# Altium PCB Main_V1.PcbDoc (part 1 of 2)
Units mil, origin at the board's own origin, x right, y up, seen from the top; angles counter-clockwise.
Board outline 5895 x 2900 mil, 4 copper layers (Top Copper, GND, PWR, Bottom Copper), stack 61.811 mil thick; 126 components, 83 nets, 421 pads, 572 vias.
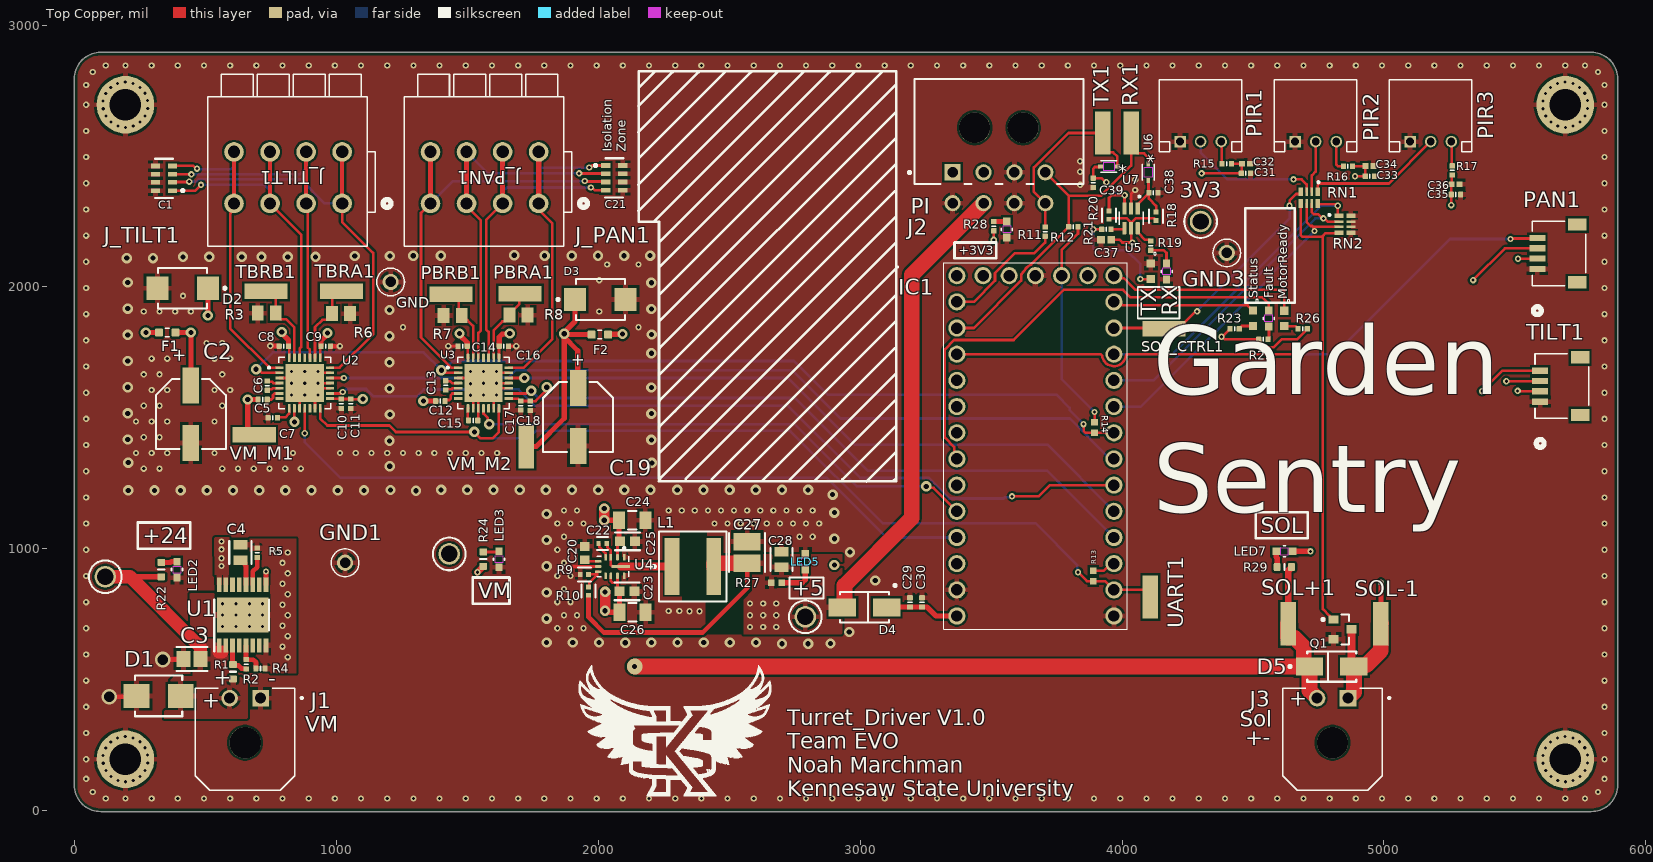
[diagram p0: Top Copper view]
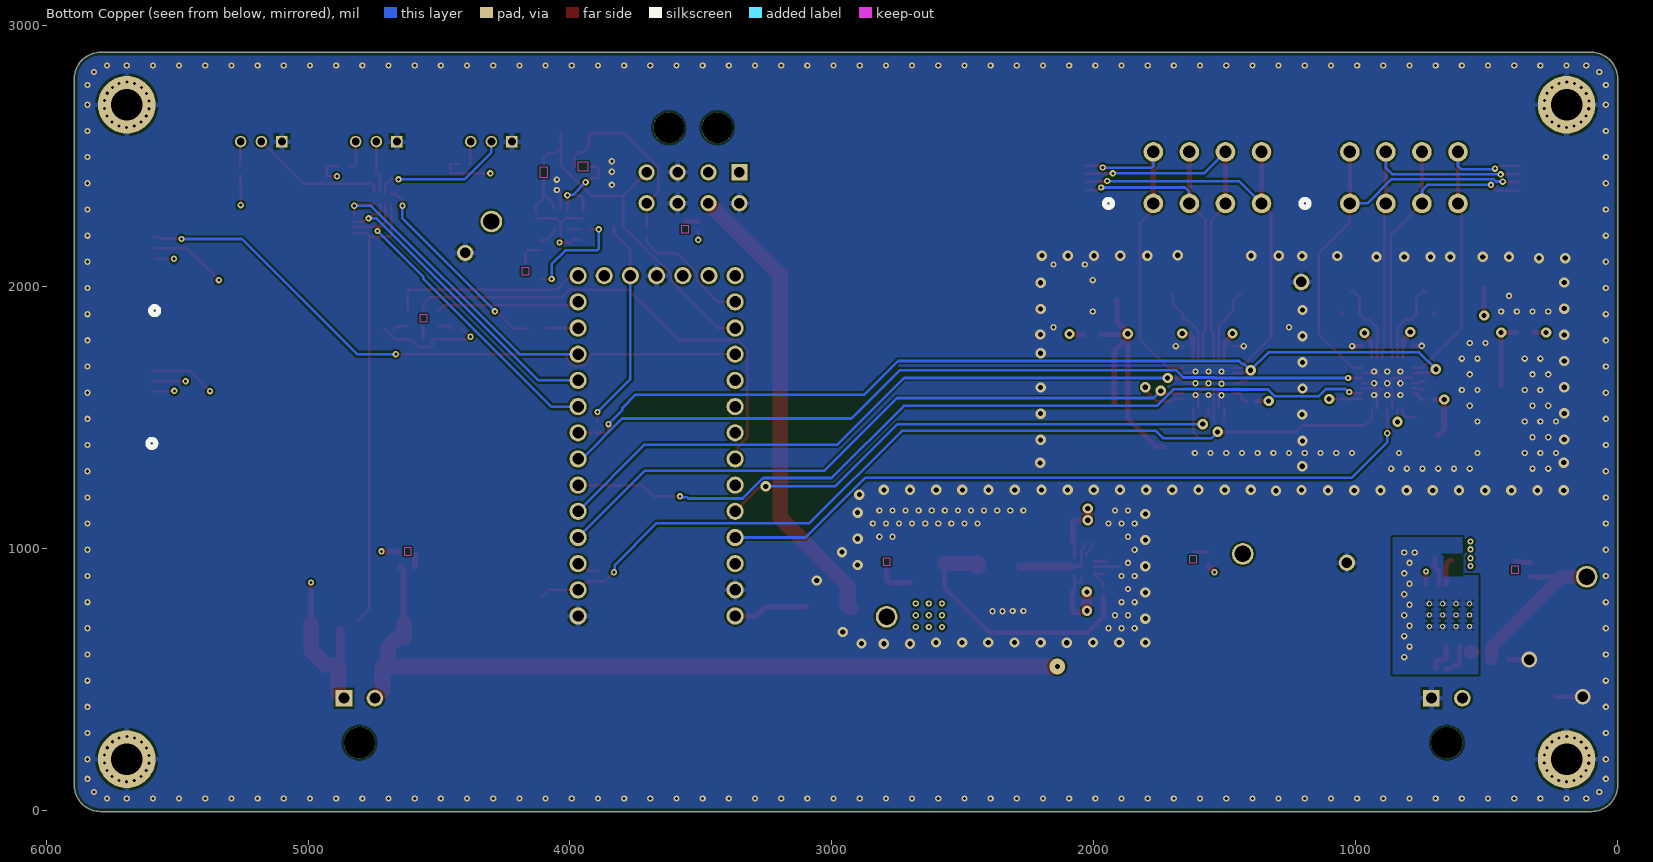
[diagram p1: Bottom Copper view, seen from below]
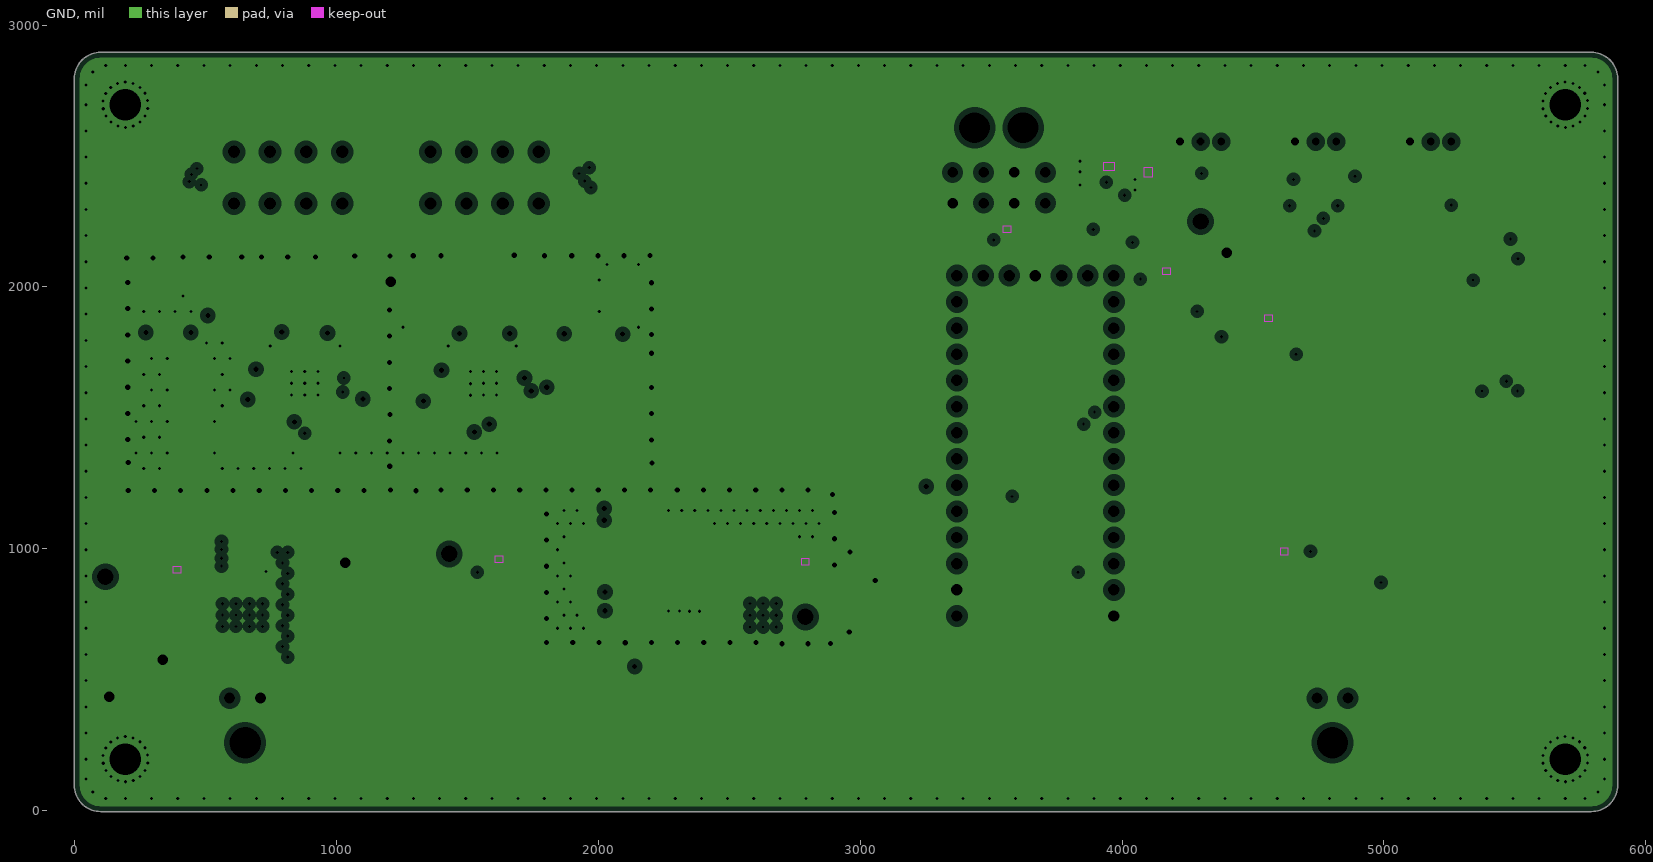
[diagram p2: GND, clearances drawn from the general rule]
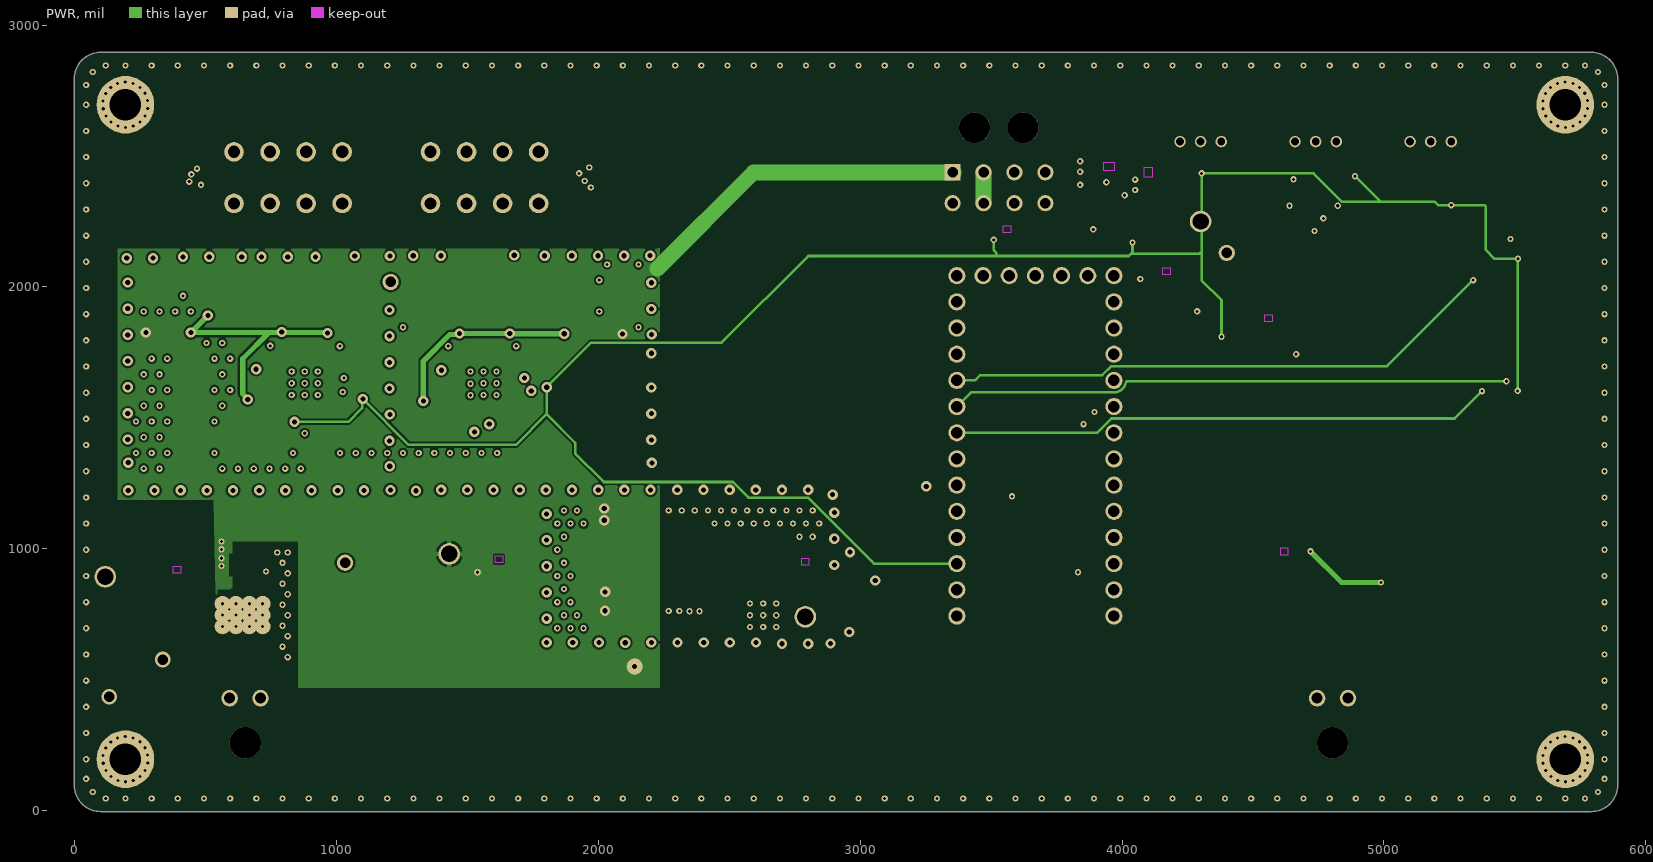
[diagram p3: PWR]
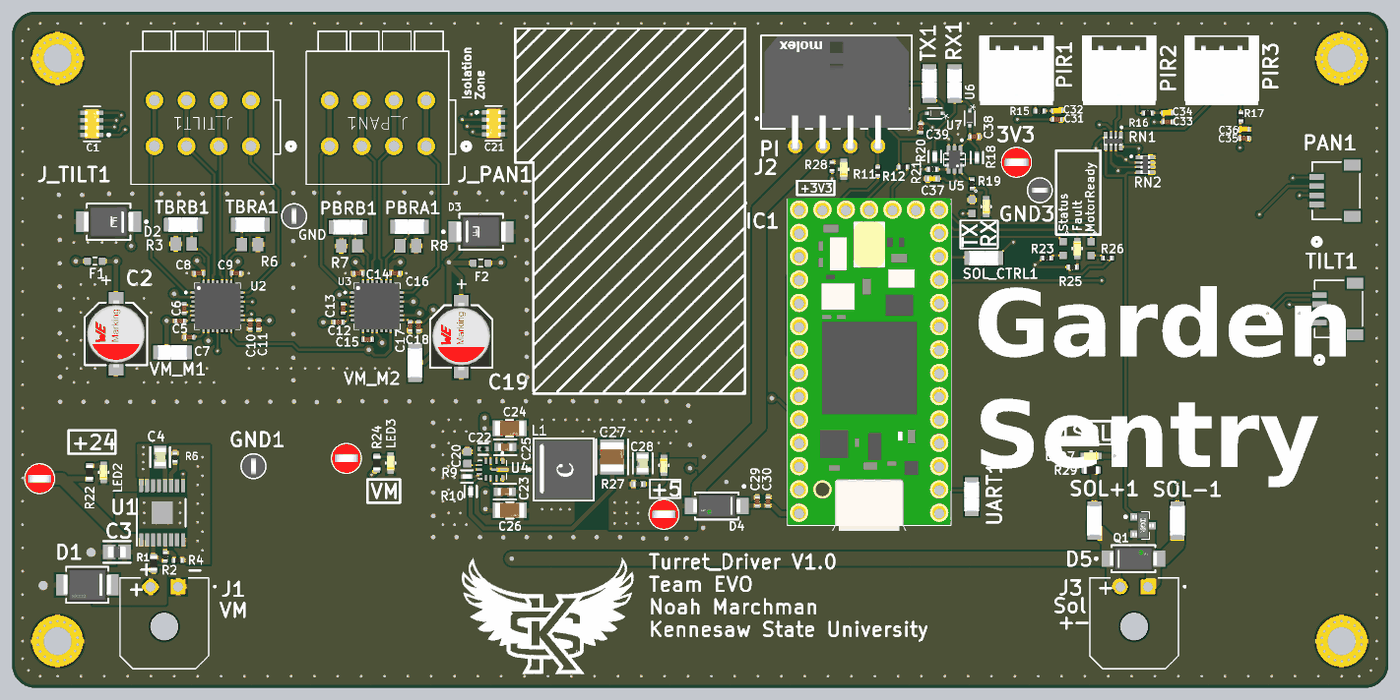
[diagram p5: 3D render of the assembled board from above, using the file's embedded part models]

## Layer stack, top to bottom
Top Mask: solder mask 0.5906, Solder Resist, Dk 3.8
Top Copper: signal copper 1.378
Dielectric 1: prepreg 7.874, 7628, Dk 4.6
GND: plane copper 0.689, net GND
Core: core 41.9291, FR-4, Dk 4.5
PWR: signal copper 0.689
Dielectric 2: prepreg 7.874, 7628, Dk 4.6
Bottom Copper: signal copper 1.378
Bottom Mask: solder mask 0.5906, Solder Resist, Dk 3.8

## Board outline
-2,96 -2,2796 cw(c98,2796) 98,2896 5793,2896 cw(c5793,2796) 5893,2796 5893,96 cw(c5793,96) 5793,-4 98,-4 cw(c98,96)

## Design rules (kind name [scope] priority, off if disabled: settings)
BoardOutlineClearance [All] p1: gap=12 ignorepadtopadclearanceinfootprint=FALSE
Clearance "Clearance Bottom Layer" [OnLayer('Bottom Layer')] p1: gap=8 ignorepadtopadclearanceinfootprint=TRUE except(10: Arc-Text Track-Text SMDPad-Text THPad-Text Via-Text Fill-Text Poly-Text Region-Text Text-Text)
Clearance "Stitching GND" [IsStitchingVia and InNet('GND') vs (IsVia and (Not IsStitchingVia)) Or IsPad] p2: gap=10 ignorepadtopadclearanceinfootprint=FALSE
Clearance "Clearance Top Layer" [OnLayer('Top Layer')] p3: gap=8 ignorepadtopadclearanceinfootprint=TRUE except(10: Arc-Text Track-Text SMDPad-Text THPad-Text Via-Text Fill-Text Poly-Text Region-Text Text-Text)
Clearance [All] p4: gap=7.87 ignorepadtopadclearanceinfootprint=FALSE except(3.5: Arc-Arc Arc-Track Arc-SMDPad Track-Track Track-SMDPad SMDPad-SMDPad; 5: Arc-Via Track-Via SMDPad-Via THPad-Via Via-Via; 10: Arc-Text Track-Text SMDPad-Text THPad-Text Via-Text Fill-Text Poly-Text Region-Text Text-Text)
HoleSize [All] p1: absolutevalues=TRUE maxlimit=248.03 minlimit=7.87 maxpercent=80.000 minpercent=20.000
MinimumAnnularRing [All] p1: minimumring=3
MinimumSolderMaskSliver [All] p1: minsoldermaskwidth=3.94
PlaneClearance [All] p1: clearance=20
PlaneConnect [All] p1: planeconnectstyle=Relief reliefexpansion=20 reliefentries=4 reliefconductorwidth=10 reliefairgap=10
PolygonConnect PolygonConnect_1 [All] p1: thpad.connectstyle=Relief thpad.reliefconductorwidth=20 thpad.reliefentries=4 thpad.polygonreliefangle="90 Angle" thpad.airgapwidth=10 smdpad.connectstyle=Relief smdpad.reliefconductorwidth=20 smdpad.reliefentries=4 smdpad.polygonreliefangle="90 Angle" smdpad.airgapwidth=10 via.connectstyle=Direct via.reliefconductorwidth=20 via.reliefentries=4 via.polygonreliefangle="90 Angle" via.airgapwidth=10
RoutingCorners [All] p1: cornerstyle=Round minsetback=100 maxsetback=100
RoutingVias [All] p1: holewidth=19.68 width=39.37 viastyle="Through Hole" minholewidth=7.87 minwidth=17.72 maxholewidth=39.37 maxwidth=78.74
SilkToSilkClearance [All] p1: silktosilkclearance=3.94
SilkToSolderMaskClearance [IsPad] p1: minsilkscreentomaskgap=3.94 clearancetoexposedcopper=TRUE
SolderMaskExpansion [All] p1: expansion=4 istentingtop=FALSE
SupplyNets "Schematic Supply Nets_8" [InNet('+3V3_R')] p1: voltage=0.000
SupplyNets "Schematic Supply Nets_7" [InNet('RTN')] p2: voltage=0.000
SupplyNets "Schematic Supply Nets_6" [InNet('+5')] p3: voltage=0.000
SupplyNets "Schematic Supply Nets_5" [InNet('GND')] p4: voltage=0.000
SupplyNets "Schematic Supply Nets_4" [InNet('VM')] p5: voltage=0.000
SupplyNets "Schematic Supply Nets_3" [InNet('+3V3')] p6: voltage=0.000
SupplyNets "Schematic Supply Nets_2" [InNet('+5OUT_Tilt')] p7: voltage=0.000
SupplyNets "Schematic Supply Nets_1" [InNet('+24')] p8: voltage=0.000
SupplyNets "Schematic Supply Nets" [InNet('+5OUT_Pan')] p9: voltage=0.000
Width [All] p1: maxlimit=100 minlimit=3.5 preferedwidth=15
23 further rules are at their usual default settings.

## Components (designator, comment, footprint, x,y, rotation, side; value= is the part's Value field where it differs from the comment)
3V3 "5010" KSTN-5010_V 4300,2250 r0 top
+3V3 "LTST-C191KRKT" LED_LTST-C191KRKT_LTO 3560,2220 r90 top (schematic designator LED6)
+5 "5010" KSTN-5010_V 2790,740 r0 top
+24 "5010" KSTN-5010_V 116,893 r0 top
C1 "470pF x 4" FP-AC0612-MFG 340,2415 r90 top value="220 pF"
C2 "100µF/50V" WCAP-ASLI_D6.3H7.7 443,1514 r90 top
C3 "1μf 100V" FP-0805-L_2_0_0_3-W_1_25-IPC_B 447,578.69 r0 top
C4 "47nF" FP-C0805C-DN-MFG 632,985.69 r90 top value="47,000 pF"
C5 "16V" CAPC0402(1005)60_L 717.28,1570 r0 top value=100nF
C6 "Capacitor 22nF +/-20% 10V 0402" CAPC0402(1005)60_L 735,1623 r270 top value=22nF/50V
C7 "10V" CAPC0402(1005)60_L 756,1500 r0 top value=2.2µF
C8 "50V" CAPC0402(1005)60_L 798,1774 r180 top value=100nF
C9 "50V" CAPC0402(1005)60_L 958,1774 r0 top value=100nF
C10 "Capacitor 10µF +/-40% 6.3V 0402" CAPC0402(1005)60_L 1018,1554 r90 top value=10µF
C11 "Capacitor 220nF +/-20% 10V 0402" CAPC0402(1005)60_L 1054,1553.72 r90 top value=220nF
C12 "16V" CAPC0402(1005)60_L 1396,1564 r0 top value=100nF
C13 "Capacitor 22nF +/-20% 10V 0402" CAPC0402(1005)60_L 1416,1624 r270 top value=22nF/50V
C14 "50V" CAPC0402(1005)60_L 1481,1774 r180 top value=100nF
C15 "10V" CAPC0402(1005)60_L 1521,1490 r180 top value=2.2µF
C16 "50V" CAPC0402(1005)60_L 1638.72,1774 r0 top value=100nF
C17 "Capacitor 220nF +/-20% 10V 0402" CAPC0402(1005)60_L 1703,1547 r90 top value=220nF
C18 "Capacitor 10µF +/-40% 6.3V 0402" CAPC0402(1005)60_L 1739,1546.28 r90 top value=10µF
C19 "100µF/50V" WCAP-ASLI_D6.3H7.7 1922,1503 r90 top
C20 "1μf 10V X7F" CAPC1608X90X35LL15T15 1948,983.41 r90 top
C21 "470pF x 4" FP-AC0612-MFG 2060.48,2416.75 r270 top value="220 pF"
C22 "100nF/16V" FP-GRM15-MFG 2016,1020 r0 top value=0.10μF
C23 "GRM188R72A104KA35D" FP-GRM188-0_1-e0_2_0_5-IPC_B 2108.61,837 r0 top
C24 "4.7uF/50V" FP-GRM31C-0_2-e0_3_0_8-IPC_C 2128.77,1109 r0 top
C25 "0.1uF/100V" FP-GRM188-0_1-e0_2_0_5-IPC_B 2110.39,1028 r0 top
C26 "GRM31CR71H475KA12L" FP-GRM31C-0_2-e0_3_0_8-IPC_C 2130,757 r0 top
C27 "47μF/16V" FP-GRM32E-0_3-0_2-IPC_C 2568,986 r90 top
C28 "0.10 μF" FP-C0805C-DN-MFG 2699,959 r90 top
C29 "Capacitor 10µF +/-40% 6.3V 0402" CAPC0402(1005)60_L 3190,795 r90 top value=10µF
C30 "Capacitor 100nF +/-20% 50V 0402" CAPC0402(1005)60_L 3236,795.28 r90 top value=100nF
C31 "Capacitor 10µF +/-40% 6.3V 0402" CAPC0402(1005)60_L 4473.28,2434 r0 top value=10µF
C32 "Capacitor 0.1 uF +/- 5% 16 V 0402" CAPC1005X56X25LL10T15 4473.65,2471 r0 top value=100nF
C33 "Capacitor 10µF +/-40% 6.3V 0402" CAPC0402(1005)60_L 4946.72,2423 r0 top value=10µF
C34 "Capacitor 0.1 uF +/- 5% 16 V 0402" CAPC1005X56X25LL10T15 4945,2462 r0 top value=100nF
C35 "Capacitor 10µF +/-40% 6.3V 0402" CAPC0402(1005)60_L 5275.28,2353 r0 top value=10µF
C36 "Capacitor 0.1 uF +/- 5% 16 V 0402" CAPC1005X56X25LL10T15 5273.65,2392 r0 top value=100nF
C37 "Capacitor 1 uF +/- 10% 6.3 V 1005" CAPC1005X55X25ML5T10 3939.29,2180 r180 top value=1µF
C38 "Capacitor 220nF +/-20% 10V 0402" CAPC0402(1005)60_L 4120,2360 r180 top value=470nF
C39 "Capacitor 220nF +/-20% 10V 0402" CAPC0402(1005)60_L 3890,2397.72 r90 top value=470nF
D1 "SMBJ33CA-13-F" FP-SMB-CA-MFG 320,437.69 r180 top
D2 "SMBJ26A" FP-SMBJ-MFG 411.54,1995 r180 top
D3 "SMBJ26A" FP-SMBJ-MFG 2007,1952 r0 top
D4 "SS14" FP-403AE-MFG 3016.35,776 r0 top
D5 "SS14" FP-403AE-MFG 4801,550 r180 top
F1 "FUSE-1A/32V-3" LFUS-467_V 352.5,1826 r180 top
F2 "FUSE-1A/32V-3" LFUS-467_V 2004.99,1818 r0 top
Fault "LTST-C191KRKT" LED_LTST-C191KRKT_LTO 4560,1880 r270 top (schematic designator LED4)
GND "5001" FP-5001-MFG 1206,2019 r90 top
GND1 "5001" FP-5001-MFG 1032,946.5 r90 top
GND3 "5001" FP-5001-MFG 4400,2130 r0 top
IC1 "TEENSY_4.0" TEENSY40 3969,743 r90 top
J1 "436500200" MOLEX_436500200 650,272.69 r0 top
J2 "43045-0802" FP-43045-0802-MFG 3529.48,2594.02 r180 top
J3 "436500200" MOLEX_436500200 4804,272.69 r0 top
J_PAN1 "2601-1104" CONN4_2601-1104_WAG 1771.59,2319 r180 top
J_TILT1 "2601-1104" CONN4_2601-1104_WAG 1021,2319 r180 top
L1 "10uH" FP-XAL6060-MFG 2360.53,932 r0 top
LED2 "LTST-C191KRKT" LED_LTST-C191KRKT_LTO 390,920 r90 top
LED3 "LTST-C191KRKT" LED_LTST-C191KRKT_LTO 1620,960 r90 top
LED5 "LTST-C191KRKT" LED_LTST-C191KRKT_LTO 2790,950 r270 top
LED7 "LTST-C191KRKT" LED_LTST-C191KRKT_LTO 4620,990 r180 top
MotorReady "LTST-C190GKT" LEDM1608X80 4620,1880 r270 top (schematic designator D8)
PAN1 "PRT-14417" CONN_PRT-14417_SPK 5669,2128 r90 top
PBRA1 "RCWCTE" TP420X150 1700,1974 r180 top
PBRB1 "RCWCTE" TP420X150 1437,1972 r0 top
PIR1 "S3B-PH-K-S" S3B-PH-K-S 4300.26,2555 r0 top
PIR2 "S3B-PH-K-S" S3B-PH-K-S 4739.63,2555 r0 top
PIR3 "S3B-PH-K-S" S3B-PH-K-S 5179,2555 r0 top
Q1 "IRLML6344" SOT95P237X112-3N-2-V 4842.16,692 r0 top
R1 "120R3J" RESC0603(1608)_L 604,530.13 r270 top value=931K
R2 "13K" RESC0402(1005)_L 654,558.69 r90 top
R3 "0.62 Ohm" RESC2013X50X40NL20T20 733,1900 r180 top
R4 "44.2K" RESC0402(1005)_L 709,542.69 r180 top
R5 "6.04K" RESC0402(1005)_L 696,984.69 r270 top
R6 "RL1220S-R82-F" RESC2013X50X40NL20T20 1017,1898 r0 top
R7 "RL1220S-R82-F" RESC2013X50X40NL20T20 1443,1891 r0 top
R8 "0.62ohm" RESC2013X50X40NL20T20 1695,1892 r0 top
R9 "24.9K Ohm" FP-CRCW0402-e3-IPC_C 1946.17,902 r0 top
R10 "100K Ohm" FP-CRCW0402-e3-IPC_C 1962,838.17 r270 top
R11 "100R2F" RESC0402(1005)_L 3706,2211.28 r90 top value=100
R12 "10KR2F" RESC0402(1005)_L 3814,2230 r0 top value=10k
R13 "Resistor 1k +/-1% 0402 100 mW" RESC1005X40X25ML05T05 3890,896 r90 top value=1k
R14 "Resistor 10k +/-1% 0402 100 mW" RESC1005X40X25ML05T05 3895,1463 r90 top value=10k
R15 "33R2J" RESC0402(1005)_L 4400,2470 r0 top value=33
R16 "33R2J" RESC0402(1005)_L 4863,2461 r0 top value=33
R17 "33R2J" RESC0402(1005)_L 5261,2445 r270 top value=33
R18 "100K Ohm" FP-CRCW0402-e3-IPC_C 4130,2270 r270 top
R19 "240R2J" RESC0402(1005)_L 4110,2157.72 r270 top value=433
R20 "100K Ohm" FP-CRCW0402-e3-IPC_C 3950,2274.17 r270 top
R21 "240R2J" RESC0402(1005)_L 3940,2220 r180 top value=240
R22 "120R3J" RESC0603(1608)_L 330,920 r90 top value=ERJ-3EKF7321V
R23 "240R2J" RESC0402(1005)_L 4430,1840 r0 top value=300
R24 "120R3J" RESC0603(1608)_L 1560,960 r90 top value=ERJ-3EKF7321V
R25 "240R2J" RESC0402(1005)_L 4540,1800 r0 top value=433
R26 "240R2J" RESC0402(1005)_L 4690,1840 r180 top value=300
R27 "Resistor 1k +/-1% 0402 100 mW" RESC1005X40X25ML05T05 2680,870 r0 top value=1k
R28 "240R2J" RESC0402(1005)_L 3510,2232.28 r90 top value=433
R29 "120R3J" RESC0603(1608)_L 4620,930 r180 top value=ERJ-3EKF7321V
RN1 "YC124-JR-07100RL" RESCAXS50P200X100X55-8N 4714.84,2340.83 r270 top
RN2 "YC124-JR-07100KL" RESCAXS50P200X100X55-8N 4851.17,2239.52 r0 top
RX "LTST-C191KRKT" LED_LTST-C191KRKT_LTO 4170,2059.5 r90 top (schematic designator LED1)
RX1 "RCWCTE" TP420X150 4035,2588 r90 top
SOL+1 "RCWCTE" TP420X150 4634,713 r90 top
SOL-1 "RCWCTE" TP420X150 4989,713 r90 top
SOL_CTRL1 "RCWCTE" TP420X150 4160,1840 r0 top
Status "LTST-C190GKT" LEDM1608X80 4500,1880.47 r270 top (schematic designator D7)
TBRA1 "RCWCTE" TP420X150 1018,1983 r180 top
TBRB1 "RCWCTE" TP420X150 730,1983 r180 top
TILT1 "PRT-14417" CONN_PRT-14417_SPK 5680,1621 r90 top
TX "LTST-C190GKT" LEDM1608X80 4110,2060 r270 top (schematic designator D6)
TX1 "RCWCTE" TP420X150 3927,2588 r90 top
U1 "TPS26600PWPR" PWP0016H_N 640.57,746.55 r90 top
U2 "TMC2209-LA" QFN50P500X500X90-29N 877.94,1632.54 r0 top
U3 "TMC2209-LA" QFN50P500X500X90-29N 1560.68,1632.54 r0 top
U4 "LMR33630ARNXR" CONV_LMR33630ARNXR 2054,932 r270 top
U5 "SN74LVC2G14IDCKRQ1" SOT65P210X110-6N 4034.41,2262.2 r270 top
U6 "RB520S30T5G" SOD-523_0P9X1P3_ONS 4100,2438.5 r270 top
U7 "RB520S30T5G" SOD-523_0P9X1P3_ONS 3950,2460 r180 top
UART1 "RCWCTE" TP420X150 4108,816 r270 top
VM "5010" KSTN-5010_V 1430,980 r0 top (schematic designator VM1)
VM_M1 "RCWCTE" TP420X150 685,1435 r180 top
VM_M2 "RCWCTE" TP420X150 1724,1390 r90 top

## Footprints (in the part's own frame and the unit in brackets; to place one, negate y for a bottom-side part, rotate by r counter-clockwise, add the part's x,y. Pads: shape width x height; smd on the part's side, far side on the other; paste and mask are expansions set on the pad)
CAPC0402(1005)60_L [mm] "Chip Capacitor, Body 1.0x0.5mm, Height 0.6mm, IPC High Density"
  rrect25% 0.5x0.55 smd: 1(-0.45,0) 2(0.45,0)
  silkscreen extent 0,-0.2 0,0.2, body extent -0.5,-0.25 0.5,0.25, height 0.6
CAPC1005X55X25ML5T10 [mm] "Chip Capacitor, 2-Leads, Body 1.05x0.55mm, IPC Low Density"
  rect 0.76x0.72 smd: 1(-0.49,0) 2(0.49,0)
  body extent -0.53,-0.28 0.53,0.28, height 0.55
CAPC1005X56X25LL10T15 [mm] "Chip Capacitor, 2-Leads, Body 1.10x0.60mm, IPC High Density"
  rect 0.58x0.54 smd: 1(-0.39,0) 2(0.39,0)
  body extent -0.55,-0.3 0.55,0.3, height 0.56
CAPC1608X90X35LL15T15 [mm] "Chip Capacitor, 2-Leads, Body 1.60x0.81mm, IPC High Density"
  rect 0.85x0.9 smd: 1(-0.65,0) 2(0.65,0)
  body extent -0.88,-0.48 0.87,0.48, height 0.9
CONN4_2601-1104_WAG [mm]
  round 1.9 hole 1.2 paste-2539.97 mask+0: 1(0,0) 2(0,-5) 3(3.5,0) 4(3.5,-5) 5(7,0) 6(7,-5) 7(10.5,0) 8(10.5,-5)
  silkscreen extent -4.74,-12.52 13.05,4.15
CONN_PRT-14417_SPK [mil]
  rect 24x61 smd paste+0 mask+0: 1(-59.06,82.74) 2(-19.69,82.74) 3(19.69,82.74) 4(59.06,82.74)
  rect 47x71 smd paste+0 mask+0: 5(-110.24,-69.82) 6(110.24,-69.82)
  silkscreen extent -234,-102 123,103
CONV_LMR33630ARNXR [mm]
  rrect40% 0.6x0.25 smd paste+0 mask+0.102: 1(-0.9,1.125) 2(-0.9,0.475) 3(-0.9,-0.175) 4(-0.9,-0.675) 8(0.9,-0.675) 9(0.9,-0.175) 10(0.9,0.475) 11(0.9,1.125)
  rrect40% 0.25x0.6 smd paste+0 mask+0.102: 5(-0.5,-1.4) 6(0,-1.4) 7(0.5,-1.4)
  rrect40% 0.25x1.825 smd paste-2 mask+0.102: 12(0,0.788)
  silkscreen extent -1.9,-1.5 1,1.57
FP-403AE-MFG [mm]
  rect 2.65x1.75 smd paste+0 mask+0: 1(-2.15,0) 2(2.15,0)
  silkscreen extent -2.37,-1.48 3.09,2.26, body extent -3.57,-1.58 3.57,1.58, height 0.25
FP-0805-L_2_0_0_3-W_1_25-IPC_B [mil]
  rect 53.4x61.35 smd paste+0 mask+0: 1(-32.52,0) 2(32.52,0)
  silkscreen extent -59,-46 59,46, body extent -69,-41 69,41, height 10
FP-5001-MFG [mm]
  round 1.57 hole 1.016 paste-2539.97 mask+0: 1(0,0)
  silkscreen extent -1.34,-1.35 1.34,1.35, body extent -1.45,-1.45 1.45,1.45, height 0.25
FP-43045-0802-MFG [mm]
  rect 1.57x1.57 hole 1.02 paste-2539.97 mask+0: 1(4.49,3.965)
  round 1.57 hole 1.02 paste-2539.97 mask+0: 2(1.49,3.965) 3(-1.51,3.965) 4(-4.51,3.965) 5(4.49,6.965) 6(1.49,6.965) 7(-1.51,6.965) 8(-4.51,6.965)
  round 3 hole 3 unplated paste-2539.97 mask+0: ""(-2.35,-0.355) ""(2.35,-0.355)
  silkscreen extent -8.2,-5.08 8.79,5.08, body extent -8.3,-5.18 8.3,7.85, height 0.25
FP-AC0612-MFG [mm]
  rect 0.45x0.89 smd paste+0 mask+0: 1(-1.2,-0.825) 2(-0.4,-0.825) 3(0.4,-0.825) 4(1.2,-0.825) 5(1.2,0.825) 6(0.4,0.825) 7(-0.4,0.825) 8(-1.2,0.825)
  silkscreen extent -1.9,-1.95 1.9,0.87, body extent -1.78,-1.37 1.78,1.37, height 0.25
FP-C0805C-DN-MFG [mm]
  rect 0.95x1.35 smd paste+0 mask+0: 1(-0.75,0) 2(0.75,0)
  silkscreen extent -1.1,-1.07 1.1,1.07, body extent -1.4,-0.85 1.4,0.85, height 0.25
FP-CRCW0402-e3-IPC_C [mil]
  rect 18.43x18.6 smd paste+0 mask+0: 1(-15.83,0) 2(15.83,0)
  silkscreen extent -25,-27 25,27, body extent -29,-15 29,15, height 10
FP-GRM15-MFG [mm]
  rect 0.4x0.5 smd paste+0 mask+0: 1(-0.4,0) 2(0.4,0)
  silkscreen extent -0.53,-0.63 0.53,0.63, body extent -0.7,-0.38 0.7,0.38, height 0.25
FP-GRM31C-0_2-e0_3_0_8-IPC_C [mil]
  rect 45.46x67.17 smd paste+0 mask+0: 1(-50.23,0) 2(50.23,0)
  silkscreen extent -16,-35 16,35, body extent -77,-39 77,39, height 10
FP-GRM32E-0_3-0_2-IPC_C [mil]
  rect 67.04x102.61 smd paste+0 mask+0: 1(-41.36,0) 2(41.36,0)
  silkscreen extent -75,-69 75,69, body extent -79,-57 79,57, height 10
FP-GRM188-0_1-e0_2_0_5-IPC_B [mil]
  rect 37.74x35.91 smd paste+0 mask+0: 1(-28.61,0) 2(28.61,0)
  silkscreen extent -47,-34 47,34, body extent -57,-28 57,28, height 10
FP-SMB-CA-MFG [mm]
  rect 2.5x2.3 smd paste+0 mask+0: 1(-2.15,0) 2(2.15,0)
  silkscreen extent -2.28,-1.97 2.28,1.97, body extent -3.5,-2.07 3.5,2.07, height 0.25
FP-SMBJ-MFG [mm]
  rect 2.16x2.26 smd paste+0 mask+0: 1(-2.45,0) 2(2.45,0)
  silkscreen extent -4.23,-1.97 2.37,1.97, body extent -3.63,-2.07 3.63,2.07, height 0.25
FP-XAL6060-MFG [mm]
  rect 1.43x5.5 smd paste+0 mask+0: 1(-2.02,0) 2(2.02,0)
  silkscreen extent -3.87,-3.38 3.28,3.38, body extent -3.38,-3.48 3.38,3.48, height 0.25
KSTN-5010_V [mm] "Test Point, Dia 3.17mm"
  round 2.1 hole 1.6: 1(0,0)
  silkscreen extent -1.59,-1.58 1.59,1.58, body extent -1.59,-1.59 1.59,1.59, height 8.13
LED_LTST-C191KRKT_LTO [mil]
  rect 30x28 smd paste+0 mask+0: 1(-30.5,0) 2(30.5,0)
  Top Copper keep-out region: -13.5,-14 -13.5,14 13.5,14 13.5,-14
  Keep-Out Layer region: -13.5,-14 -13.5,14 13.5,14 13.5,-14
  silkscreen extent -4,-21 4,21, body extent 0,0 0,0
LEDM1608X80 [mm]
  rect 0.8x0.8 smd: A(0.75,0) C(-0.75,0)
  silkscreen extent -1.83,0.27 -1.57,0.53
LFUS-467_V [mm] "SMD, 2-Leads, Body 1.6x0.813mm"
  rrect25% 0.75x0.8 smd: 1(-0.8,0) 2(0.8,0)
  silkscreen extent -0.2,-0.4 0.2,0.4, body extent -0.8,-0.41 0.8,0.41, height 0.43
MOLEX_436500200 [mm]
  rect 1.605x1.605 / inner round 1.605 / far side rect 1.605x1.605 hole 1.07: 1(1.5,3.97)
  round 1.605 hole 1.07: 2(-1.5,3.97)
  round 3.05 hole 3.05 unplated: ""(0,-0.35)
  silkscreen extent -4.82,-4.95 5.6,4.95
PWP0016H_N [mm]
  rect 1.4x0.45 smd paste+0 mask+0.051: 1(-2.95,2.275) 2(-2.95,1.625) 3(-2.95,0.975) 4(-2.95,0.325) 5(-2.95,-0.325) 6(-2.95,-0.975) 7(-2.95,-1.625) 8(-2.95,-2.275) 9(2.95,-2.275) 10(2.95,-1.625) 11(2.95,-0.975) 12(2.95,-0.325) 13(2.95,0.325) 14(2.95,0.975) 15(2.95,1.625) 16(2.95,2.275)
  rect 3.4x5 smd paste-2.487 mask-2.489: 17(0,0)
  round 0.5 / inner round 1.524 / far side round 0.5 hole 0.3 paste-2539.97 mask-0.241: V(-1.1,1.95) V(-1.1,-1.95) V(0,1.95) V(0,0.65) V(0,-0.65) V(0,-1.95) V(1.1,1.95) V(1.1,-1.95)
  round 0.5 / inner round 1.524 / far side round 0.5 hole 0.3 paste-2539.97 mask-0.152: V(-1.1,-0.65) V(-1.1,0.65) V(1.1,-0.65) V(1.1,0.65)
  silkscreen extent -3.55,-2.55 1.5,2.75
QFN50P500X500X90-29N [mm]
  rrect25% 0.81x0.27 smd: 1(-2.45,1.5) 2(-2.45,1) 3(-2.45,0.5) 4(-2.45,0) 5(-2.45,-0.5) 6(-2.45,-1) 7(-2.45,-1.5) 15(2.45,-1.5) 16(2.45,-1) 17(2.45,-0.5) 18(2.45,0) 19(2.45,0.5) 20(2.45,1) 21(2.45,1.5)
  rrect25% 0.27x0.81 smd: 8(-1.5,-2.45) 9(-1,-2.45) 10(-0.5,-2.45) 11(0,-2.45) 12(0.5,-2.45) 13(1,-2.45) 14(1.5,-2.45) 22(1.5,2.45) 23(1,2.45) 24(0.5,2.45) 25(0,2.45) 26(-0.5,2.45) 27(-1,2.45) 28(-1.5,2.45)
  rect 3.7x3.7 smd paste-0.68: 29(0,0)
  silkscreen extent -3.56,-2.5 2.5,2.5, body extent -2.5,-2.5 2.5,2.5, height 0.9
RESC0402(1005)_L [mm] "Chip Resistor, Body 1.0x0.5mm, IPC High Density"
  rrect25% 0.5x0.55 smd: 1(-0.45,0) 2(0.45,0)
  silkscreen extent 0,-0.2 0,0.2, body extent -0.5,-0.25 0.5,0.25, height 0.3
RESC0603(1608)_L [mm] "Chip Resistor, Body 1.6x0.8mm, IPC High Density"
  rrect25% 0.66x0.76 smd: 1(-0.7,0) 2(0.7,0)
  silkscreen extent 0,-0.3 0,0.3, body extent -0.8,-0.4 0.8,0.4, height 0.45
RESC1005X40X25ML05T05 [mm] "Chip Resistor, 2-Leads, Body 1.05x0.55mm, IPC Low Density"
  rect 0.65x0.65 smd: 1(-0.5,0) 2(0.5,0)
  body extent -0.53,-0.28 0.53,0.28, height 0.4
RESC2013X50X40NL20T20 [mm] "Chip Resistor, 2-Leads, Body 2.00x1.25mm, IPC Medium Density"
  rect 1.15x1.45 smd: 1(-0.875,0) 2(0.875,0)
  body extent -1.1,-0.72 1.1,0.72, height 0.5
RESCAXS50P200X100X55-8N [mm]
  rect 0.87x0.41 smd: 1(-0.58,0.825) 4(-0.58,-0.825) 5(0.58,-0.825) 8(0.58,0.825)
  rect 0.87x0.26 smd: 2(-0.58,0.25) 3(-0.58,-0.25) 6(0.58,-0.25) 7(0.58,0.25)
  silkscreen extent -1.6,0.8 -1.4,1, body extent -0.5,-1 0.5,1, height 0.55
S3B-PH-K-S [mil]
  rect 43.62x43.62 / inner round 43.62 / far side rect 43.62x43.62 hole 30 mask+4.02: 1(-78.74,0)
  round 43.62 hole 30 mask+4.02: 2(0,0) 3(78.74,0)
  silkscreen extent -157,-39 157,236, body extent -156,-60 156,239, height 189
SOD-523_0P9X1P3_ONS [mil]
  rect 20x14 smd paste+0 mask+0: 1(-31.5,0) 2(31.5,0)
  Top Copper keep-out region: -19.5,-15.5 -19.5,15.5 19.5,15.5 19.5,-15.5
  Keep-Out Layer region: -19.5,-15.5 -19.5,15.5 19.5,15.5 19.5,-15.5
  silkscreen extent -31,-23 31,23, body extent -34,-17 34,17, height 18
SOT65P210X110-6N [mm]
  rrect25% 1.19x0.4 smd paste+0 mask+0.102: 1(-0.96,0.65) 2(-0.96,0) 3(-0.96,-0.65) 4(0.96,-0.65) 5(0.96,0) 6(0.96,0.65)
  silkscreen extent -2.2,-1.17 0.63,1.17, body extent -1.05,-1 1.05,1, height 1.1
SOT95P237X112-3N-2-V [mm] "SOT,0.95mm pitch;3 pin,1.30mm W X 2.92mm L X 1.12mm H body"
  rect 0.972x0.802 smd paste+0 mask+0: 1(-0.885,0.95) 2(-0.885,-0.95) 3(0.885,0)
  silkscreen extent -2.02,-1.46 0.65,1.46, body extent -1.2,-1.46 1.2,1.46, height 1.12
TEENSY40 [mm]
  round 1.665 hole 1.11: 1(0,0) 2(2.54,0) 3(5.08,0) 4(7.62,0) 5(10.16,0) 6(12.7,0) 7(15.24,0) 8(17.78,0) 9(20.32,0) 10(22.86,0) 11(25.4,0) 12(27.94,0) 13(30.48,0) 14(33.02,0) 15(33.02,2.54) 16(33.02,5.08) 17(33.02,7.62) 18(33.02,10.16) 19(33.02,12.7) 20(33.02,15.24) 21(30.48,15.24) 22(27.94,15.24) 23(25.4,15.24) 24(22.86,15.24) 25(20.32,15.24) 26(17.78,15.24) 27(15.24,15.24) 28(12.7,15.24) 29(10.16,15.24) 30(7.62,15.24) 31(5.08,15.24) 32(2.54,15.24) 33(0,15.24)
  silkscreen extent -1.27,-1.27 34.29,16.51, body extent -1.87,-1.27 34.39,16.51, height 4.55
TP420X150 [mm]
  rect 4.2x1.5 smd: 1(0,0)
  body extent -1.6,-0.8 1.6,0.8, height 2.01
WCAP-ASLI_D6.3H7.7 [mm] "Aluminium Electrolytic V-Chip SMT Capacitors, 6.3x7.7mm"
  rect 3.5x1.6 smd: 1(2.8,0) 2(-2.8,0)
  silkscreen extent -3.4,-3.4 3.4,3.4, body extent -3.65,-3.3 3.65,3.3, height 7.7

## Part data
3V3 +5 +24 VM: library part CMP-1672-00002-4, "Test Point, Red, Through Hole, RoHS, Bulk", Colour=Red, Manufacturer=Keystone, Package Quantity=100, ComponentLink1Description="Manufacturer URL", ComponentLink1URL=http://www.keyelco.com/, ComponentLink2Description=Datasheet, ComponentLink2URL=http://www.keyelco.com/product-pdf.cfm?p=1319, Contact Material=Bronze, Contact Plating=Silver, DatasheetVersion="Rev. F, 12/2013", Height="8.12 mm", Mount="Through Hole", Mounting Technology="Through Hole", PackageDescription="1-Pin Through Hole Device, Dia 3.17 mm", PackageReference=5010, Packaging=Bulk, Pins=1, REACH SVHC="No SVHC", RoHSCompliant=true
+3V3 Fault LED2 LED3 LED5 LED7 RX: "Description", Manufacturer_Name=LITE-ON, Copyright="Copyright (C) 2025 Ultra Librarian. All rights reserved.", Manufacturer_Part_Number=LTST-C191KRKT
C1: library part CMP-03425-000006-1, "AC0612 220 pF NP0 5.00% 50 V", Capacitance="220 pF", Manufacturer=Yageo, Manufacturer Part Number=AC0612JRNPO9BN221, Package=AC0612, Temperature="-55°C to +125°C", Temperature Characteristic=NP0, Temperature Coefficient=30ppm/°C, Temperature Range High=+125°C, Temperature Range Low=-55°C, Tolerance=0.05, Voltage Rating="50 V", Automotive=Yes, Automotive Grade="Grade 1", Category=Cap, ComponentLink2Description=Datasheet, ComponentLink2URL=http://www.yageo.com/documents/recent/UPY-AC_NP0X7R_16V-to-630V_12.pdf, Device Class L1="Passive Components", Device Class L2=Capacitors, Device Class L3="Capacitor Arrays", Footprint Url=http://www.yageo.com/exep/pages/download/literatures/UPY-C_GEN_24.pdf, Height=0.9mm, Lead Free=Yes, Material=Ceramic, Octopart=https://octopart.com/ac0612jrnpo9bn221-yageo-75656623, RoHS=TRUE
C2 C19: library part CMP-03913-54202496-2, "Cap Aluminum Lytic 100uF 35V 20% (6.3 X 7.7mm) SMD 300mA 2000h 105C T/R", Capacitance=100µF, Case/Package=Radial, ESR (Equivalent Series Resistance)=321.392mΩ, Insulation Resistance=1MΩ, Leakage Current=35µA, Max Operating Temperature=105°C, Min Operating Temperature=-55°C, Ripple Current=300mA, Tolerance=20%, Voltage Rating=35V, Diameter=6.3mm, Dissipation Factor=14%, Height=7.7mm, Impedance=380mΩ, Length=7.7mm, Life (Hours)=2000hours, Packaging="Cut Tape", REACH SVHC=Unknown, Ripple Current (AC)=300mA, RoHS=Compliant, Voltage Rating (DC)=35V, Width=6.6mm
C3: library part CMP-14477-003884-2, "None"
C4: library part CMP-03020-021891-1, "C0805 47,000 pF U2J 30ppm/°C 1.00% 50 V", Capacitance="47,000 pF", Manufacturer=KEMET, Manufacturer Part Number=C0805C473F5JACAUTO, Package=C0805C-DN, Temperature="-55°C to +125°C", Temperature Characteristic=U2J, Temperature Coefficient=30ppm/°C, Temperature Range High=+125°C, Temperature Range Low=-55°C, Tolerance=0.01, Voltage Rating="50 V", Automotive=No, Category=Cap, ComponentLink2Description=Datasheet, ComponentLink2URL=https://content.kemet.com/datasheets/KEM_C1003_C0G_SMD.pdf, Device Class L1="Passive Components", Device Class L2=Capacitors, Device Class L3="Ceramic Capacitors", Height=0.88mm, Ipc Land Pattern Name=CAPC200125X78, Lead Free=Yes, Material=Ceramic, Octopart=https://octopart.com/c0805c473f5jacauto-kemet-84731962, RoHS=TRUE
C5 C12 C30: library part CMP-001-00067-3, "Chip Capacitor, 100nF +/-20%, 50V, 0402, Thickness 0.6 mm", Case/Package=0402, Max Operating Temperature=85°C, Min Operating Temperature=-55°C, Tolerance=10%, Voltage Rating=50V, Mounting Technology=SMT, Pins=2
C6 C13: library part CMP-001-00062-3, "Chip Capacitor, 22nF +/-20%, 10V, 0402, Thickness 0.6 mm", Case/Package=0402, Max Operating Temperature=85°C, Min Operating Temperature=-55°C, Tolerance=10%, Voltage Rating=10V, Mounting Technology=SMT, Pins=2
C7 C15: library part CMP-001-00056-4, "Chip Capacitor, 2,2µF +/-20%, 10V, 0402, Thickness 0.6 mm", Case/Package=0402, Max Operating Temperature=85°C, Min Operating Temperature=-55°C, Tolerance=10%, Mounting Technology=SMT, Pins=2, Voltage Rating=10V
C8 C9 C14 C16: library part CMP-001-00067-3, "Chip Capacitor, 100nF +/-20%, 50V, 0402, Thickness 0.6 mm", Case/Package=0402, Max Operating Temperature=85°C, Min Operating Temperature=-55°C, Tolerance=10%, Mounting Technology=SMT, Pins=2, Voltage Rating=50V
C10 C18 C29 C31 C33 C35: library part CMP-001-00074-3, "Chip Capacitor, 10µF +/-40%, 6.3V, 0402, Thickness 0.6 mm", Case/Package=0402, Max Operating Temperature=85°C, Min Operating Temperature=-55°C, Tolerance=10%, Voltage Rating=6.3V, Mounting Technology=SMT, Pins=2
C11 C17: library part CMP-001-00057-3, "Chip Capacitor, 220nF +/-20%, 10V, 0402, Thickness 0.6 mm", Case/Package=0402, Max Operating Temperature=85°C, Min Operating Temperature=-55°C, Tolerance=10%, Voltage Rating=10V, Mounting Technology=SMT, Pins=2
C20: library part CMP-2006-04500-1, Manufacturer="AVX Interconnect / Elco", Part Number=0603YC105MAT2A
C21: library part CMP-03425-000006-1, Capacitance="220 pF", Manufacturer=Yageo, Manufacturer Part Number=AC0612JRNPO9BN221, Package=AC0612, Temperature="-55°C to +125°C", Temperature Characteristic=NP0, Temperature Coefficient=30ppm/°C, Temperature Range High=+125°C, Temperature Range Low=-55°C, Tolerance=0.05, Voltage Rating="50 V", Automotive=Yes, Automotive Grade="Grade 1", Category=Cap, ComponentLink2Description=Datasheet, ComponentLink2URL=http://www.yageo.com/documents/recent/UPY-AC_NP0X7R_16V-to-630V_12.pdf, Device Class L1="Passive Components", Device Class L2=Capacitors, Device Class L3="Capacitor Arrays", Footprint Url=http://www.yageo.com/exep/pages/download/literatures/UPY-C_GEN_24.pdf, Height=0.9mm, Lead Free=Yes, Material=Ceramic, Octopart=https://octopart.com/ac0612jrnpo9bn221-yageo-75656623, RoHS=TRUE
C22: library part CMP-2100-03641-2, "CAP CER 0.1UF 16V X7R 0402", Capacitance=0.10μF, Manufacturer=Murata, Manufacturer Part Number=GRM155R71C104KA88D, Package=GRM15, Temperature="-55°C to +125°C", Temperature Characteristic=X7R, Temperature Range High=+125°C, Temperature Range Low=-55°C, Tolerance=10%, Voltage Rating=16Vdc, Category=Cap, ComponentLink2Description=Datasheet, ComponentLink2URL=https://search.murata.co.jp/Ceramy/image/img/A01X/G101/ENG/GRM155R71H471KA01-01A.pdf, Device Class L1="Passive Components", Device Class L2=Capacitors, Device Class L3="Ceramic Capacitors", Digikey Description="CAP CER 0.1UF 16V X7R 0402", Height=0.55mm, Ipc Land Pattern Name=CAPC10050X219, Lead Free=yes, Material=Ceramic, Mouser Description="0402 0.1 uF 16V ±10 % Tolerance X7R SMT Multilayer Ceramic Capacitor", Octopart=https://octopart.com/grm155r71c104ka88d-murata-196880, RoHS=TRUE, Standoff Height=0mm
C23 C25: library part CMP-1035-02595-8, "Chip Multilayer Ceramic Capacitors for General Purpose, 0603, 0.10uF, X7R, 15%, 10%, 100V", Capacitance=100nF, Case Code (Imperial)=0603, Case Code (Metric)=1608, Dielectric=X7R, Max Operating Temperature=125°C, Min Operating Temperature=-55°C, Package Quantity=1, Tolerance=10%, Voltage=100V, Case/Package=0603, Depth=0.8mm, Height=0.8mm, Lead Free="Lead Free", Length=1.6mm, Material=Ceramic, Mount="Surface Mount", Packaging="Tape and Reel", Radiation Hardening=No, REACH SVHC="No SVHC", Termination=SMD/SMT, Thickness=0.035inch, Voltage Rating=100V, Voltage Rating (DC)=100V, Weight=0.000222oz, Width=0.8mm
C24 C26: library part CMP-1037-04923-3, "Chip Multilayer Ceramic Capacitors for General Purpose, 1206, 4.7uF, X7R, 15%, 10%, 50V", Capacitance=4.7uF, Case Code (Imperial)=1206, Case Code (Metric)=3216, Dielectric=X7R, Max Operating Temperature=125°C, Min Operating Temperature=-55°C, Package Quantity=2000, Tolerance=10%, Voltage=50V, Case/Package=1206, Depth=1.6mm, Height=1.6mm, Lead Free="Lead Free", Length=3.2mm, Material=Ceramic, Mount="Surface Mount", Packaging="Tape and Reel", Radiation Hardening=No, REACH SVHC="No SVHC", Termination=SMD/SMT, Thickness=0.071inch, Voltage Rating=50V, Voltage Rating (DC)=50V, Width=0.063inch
C27: library part CMP-2000-06362-2, "CAP CER 47UF 16V X5R 1210", Capacitance=47uF, Case Code (Imperial)=1210, Case Code (Metric)=3225, Dielectric=X5R, Max Operating Temperature=85°C, Min Operating Temperature=-55°C, Package Quantity=1, Tolerance=10%, Voltage=16V, Case/Package=1210, Depth=2.5mm, Height=2.5mm, Lead Free="Lead Free", Length=3.2mm, Material=Ceramic, Mount="Surface Mount", Number of Pins=2, Packaging="Cut Tape", Radiation Hardening=No, REACH SVHC="No SVHC", RoHS Compliant=Yes, Termination=SMD/SMT, Thickness=0.106inch, Voltage Rating=16V, Voltage Rating (DC)=16V, Width=0.098inch
C28: library part CMP-1036-04423-3, "CAP CER 0.1UF 50V X7R 0805", Manufacturer=KEMET, Manufacturer Part Number=C0805C104M5RACTU, Package=C0805C-DN, Temperature="-55°C to +125°C", Temperature Characteristic=X7R, Temperature Coefficient=30ppm/°C, Temperature Range High=+125°C, Temperature Range Low=-55°C, Tolerance=0.2, Voltage Rating="50 V", Automotive=No, Capacitance="0.10 μF", Category=Cap, ComponentLink2Description=Datasheet, ComponentLink2URL=https://content.kemet.com/datasheets/KEM_C1003_C0G_SMD.pdf, Device Class L1="Passive Components", Device Class L2=Capacitors, Device Class L3="Ceramic Capacitors", Digikey Description="CAP CER 0.1UF 50V X7R 0805", Height=0.88mm, Ipc Land Pattern Name=CAPC200125X78, Lead Free=Yes, Material=Ceramic, Mouser Description="Multilayer Ceramic Capacitors MLCC - SMD/SMT 50volts 0.1uF X7R 20%", Octopart=https://octopart.com/c0805c104m5ractu-kemet-129379, RoHS=TRUE
C32 C34 C36: library part CMP-001-00001-6, "Chip Capacitor, 0.1 uF, +/- 5%, 16 V, 0402 (1005 Metric)", Capacitor Type=Ceramic, Case/Package=0402, Max Operating Temperature=125°C, Min Operating Temperature=-55°C, Tolerance=5%, Voltage Rating=16V, Mounting Technology=SM, Pins=2, RoHS Compliant=True
C37: library part CMP-001-00009-6, "Chip Capacitor, 1 uF, +/- 10%, 6.3 V, 1005 (0402 Metric)", Capacitor Type=Ceramic, Case/Package=0402, Max Operating Temperature=85°C, Min Operating Temperature=-55°C, Tolerance=10%, Voltage Rating=6.3V, Mounting Technology=SM, Pins=2, RoHS Compliant=True
C38 C39: library part CMP-001-00057-3, Case/Package=0402, Max Operating Temperature=85°C, Min Operating Temperature=-55°C, Tolerance=10%, Voltage Rating=10V, Mounting Technology=SMT, Pins=2
D1: library part CMP-12828-000022-1, "TVS DIODE 33V 53.3V SMB", Breakdown Voltage=42.2V, Capacitance=800pF, Case/Package=SMB, Clamping Voltage=53.3V, Leakage Current=5uA, Max Operating Temperature=150°C, Max Output Current=11.3A, Max Power Dissipation=600W, Min Breakdown Voltage=36.7V, Min Operating Temperature=-55°C, Package Quantity=3000, Power Line Protection=No, Reverse Standoff Voltage=33V, Test Current=1mA, Composition=Zener, Contact Plating=Tin, Direction=Bidirectional, Element Configuration=Single, ESD Protection=No, Height=2.62mm, Lead Free="Lead Free", Length=4.57mm, Max Breakdown Voltage=42.2V, Max Reverse Leakage Current=5uA, Max Surge Current=11.3A, Mount="Surface Mount", Number of Bidirectional Channels=1, Number of Elements=1, Number of Pins=2, Packaging="Tape and Reel", Peak Pulse Current=11.3A, Peak Pulse Power=600W, Polarity=Bidirectional, Power Dissipation=600W, Radiation Hardening=No, Reverse Breakdown Voltage=36.7V, Termination=SMD/SMT, Voltage Rating (DC)=33V, Width=3.9mm, Working Voltage=33V
D2 D3: library part CMP-08607-000063-1, "TVS DIODE 26V 42.1V DO214AA", Breakdown Voltage=28.9V, Clamping Voltage=42.1V, Manufacturer=Littelfuse, Max Junction Temp=+150°C, Package=SMBJ, Peak Pulse Current=14.3A, Peak Pulse Power=600W, Reverse Standoff Voltage=26V, Temperature="-65°C to +150°C", Temperature Range Low=-65°C, Automotive=No, Category=Diode, ComponentLink2Description=Datasheet, ComponentLink2URL=https://www.littelfuse.com/~/media/electronics/datasheets/tvs_diodes/littelfuse_tvs_diode_smbj_datasheet.pdf.pdf, Device Class L1="Circuit Protection", Device Class L2="TVS Diodes", Device Class L3=unset, Digikey Description="TVS DIODE 26V 42.1V DO214AA", Direction=Unidirectional, Height=2.61mm, Lead Free=Yes, Manufacturer Part Number=SMBJ26A, Mouser Description="TVS Diodes - Transient Voltage Suppressors 26Vr 600W 14.3A 5% UniDirectional", Number Of Channels=1, Octopart=https://octopart.com/smbj26a-littelfuse-350771, RoHS=TRUE, Temperature Range High=+150°C
D4 D5: library part CMP-2000-04943-2, "DIODE SCHOTTKY 40V 1A SMA", Forward Current=1A, Manufacturer="ON Semiconductor", Max Junction Temp=+125°C, Max Repetitive Reverse Voltage=40V, Max Surge Forward Current=40A, Package=403AE, Peak Reverse Current=0.2mA, Temperature="-65°C to +125°C", Temperature Range Low=-65°C, Automotive=No, Category=Diode, ComponentLink2Description=Datasheet, ComponentLink2URL=https://www.onsemi.com/pub/Collateral/SS19-D.PDF, Device Class L1="Discrete Semiconductors", Device Class L2=Diodes, Device Class L3="Schottky Diodes", Digikey Description="DIODE SCHOTTKY 40V 1A SMA", Height=2.5mm, Lead Free=Yes, Manufacturer Part Number=SS14, Mouser Description="Schottky Diodes & Rectifiers SMA 40V 1.0A", Octopart=https://octopart.com/ss14-on+semiconductor-29205033, RoHS=TRUE, Standoff Height=0.05mm, Temperature Range High=+125°C
F1 F2: library part CMP-005-00012-2, "Fast Acting Fuse, 1 A, 32 V, -55 to 90 degC, 2-Pin SMD, RoHS, Tape and Reel", Case/Package=LFUS-467, Current Rating=1A, Pins=2
GND GND1 GND3: library part CMP-2000-05181-2, "PC TEST POINT MINIATURE BLACK", Color=Black, Flammability Rating="UL94 V-0", Package Quantity=100, Body Material=Bronze, Contact Material=Bronze, Contact Plating=Silver, Diameter=2.54mm, Height=0.3inch, Hole Diameter=1.6mm, Housing Color=Black, Inside Diameter=1.27mm, Insulation=Insulated, Insulation Material=Nylon, Lead Free="Lead Free", Length=7.62mm, Material=Nylon, Mount="Through Hole", Number of Contacts=1, Number of Ports=1, Orientation=Straight, Outside Diameter=2.54mm, Packaging=Bulk, Plating=Silver, REACH SVHC="No SVHC", RoHS Compliant=Yes, Series=THM, Termination="Through Hole"
IC1: "Integrated Circuit", Manufacturer_Name=Teensy, Manufacturer_Part_Number="TEENSY 4.0", Datasheet Link=https://www.pjrc.com/store/teensy40.html, Height=4.64mm
J1 J3: "Connector Header Through Hole, Right Angle 2 position 0.118 (3.00mm)", Package=None, Check_prices=https://www.snapeda.com/parts/436500200/Molex/view-part/?ref=eda, MF=Molex, MP=436500200, SnapEDA_Link=https://www.snapeda.com/parts/436500200/Molex/view-part/?ref=snap
J2: library part CMP-04776-000999-1, "CONN HEADER R/A 8POS 3MM", Case/Package=0802, Color=Black, Contact Resistance=10mR, Current Rating=5A, Flammability Rating="UL94 V-0", Insulation Resistance=1GR, Max Operating Temperature=105°C, Max Voltage Rating (DC)=250.25kV, Min Operating Temperature=-40°C, Package Quantity=1440, Voltage Rating=250V, Connector Type=Plug, Contact Material=Brass, Contact Plating=Gold, Depth=12.2mm, Diameter=3mm, Gender=Male, Glow Wire Compliant=Compliant, Halogen Free="Low Halogen", Height=8.77mm, Housing Color=Black, Housing Material=Thermoplastic, Lead Free="Lead Free", Length=16.15mm, Max Current Rating=5A, Mount="Through Hole", Number of Circuits=8, Number of Contacts=8, Number of Positions=8, Number of Rows=2, Orientation="Right Angle", Packaging=Tray, Pitch=3mm, Radiation Hardening=No, Reach SVHC Compliant=Yes, RoHS Compliant=Yes, Row Spacing=3mm, Series="Micro-Fit 3.0", Termination=Solder, Voltage Rating (DC)=250V
J_PAN1 J_TILT1: "Description", Manufacturer_Name=Wago, Copyright="Copyright (C) 2026 Ultra Librarian. All rights reserved.", Manufacturer_Part_Number=2601-1104, RefDes=RefDes, Type=Type
L1: library part CMP-11268-000112-1, "Power inductor, shielded,10uH 20% tol, 29.82mOhms, SMT, RoHS, Halogen Free, AEC - Q200", DC Resistance (DCR)=29.82mR, Max DC Current=7A, Max Operating Temperature=125°C, Min Operating Temperature=-40°C, Package Quantity=21, Self Resonant Frequency=14MHz, Test Frequency=100kHz, Tolerance=20%, Core Material=Composite, Height=6.1mm, Inductance=10uH, Lead Free="Contains Lead", Length=6.76mm, Packaging="Tape and Reel", RoHS Compliant=Yes, Series=XAL6060, Shielding=Shielded, Termination=SMD/SMT, Width=6.56mm
MotorReady Status TX U4: Package=None, Availability=Unavailable, Price=None
  MotorReady Status TX: MF="{'manufacturer': u'Lite-On Inc.'}", MP=LTST-C190GKT
  U4: MF="{'manufacturer': u'Texas Instruments'}", MP=LMR33630ARNXR
PAN1 TILT1: "Description", Manufacturer_Name=Sparkfun, Copyright="Copyright (C) 2026 Ultra Librarian. All rights reserved.", Manufacturer_Part_Number=PRT-14417, RefDes=RefDes, Type=Type
PBRA1 PBRB1 RX1 SOL+1 SOL-1 SOL_CTRL1 TBRA1 TBRB1 TX1 UART1 VM_M1 VM_M2: "- PC Test Point - - Plating Surface Mount Mounting Type", Package=None, Check_prices=https://www.snapeda.com/parts/RCWCTE/KOA+Speer/view-part/?ref=eda, Digi-Key_Part_Number=2019-RCWCTETR-ND, MF="KOA Speer", MP=RCWCTE, Purchase-URL=https://pricing.snapeda.com/search/part/RCWCTE/?ref=eda, SnapEDA_Link=https://www.snapeda.com/parts/RCWCTE/KOA+Speer/view-part/?ref=snap
PIR1 PIR2 PIR3: "Connector Header Through Hole, Right Angle 3 position 0.079 (2.00mm)", Package="NON STANDARD-3 J.S.T.", Check_prices=https://www.snapeda.com/parts/S3B-PH-K-S/JST/view-part/?ref=eda, MF="JST Sales", MP=S3B-PH-K-S, SnapEDA_Link=https://www.snapeda.com/parts/S3B-PH-K-S/JST/view-part/?ref=snap
Q1: "Insulated-Gate Field-Effect Transistor (IGFET), N-Channel, Enhancement, Body Diode, Pin 1 Gate, 2 Source, 3 Drain, 3 Pins", Manufacturer="Infineon Technologies", Manufacturer Order Number=IRLML6344, PackageReference=PG-SOT23-3-901
R1: library part CMP-009-00069-2, "931K 0603 (1608 Metric)  SMD", Case/Package=0603, Power=100mW, Tolerance=5%, Mounting Technology=SMT, Pins=2
R2: library part CMP-009-00064-2, "13K 0402 (1005 Metric)  SMD", Case/Package=0402, Power=63mW, Tolerance=1%, Mounting Technology=SMT, Pins=2
R3 R8: library part CMP-2001-03173-1, Manufacturer=Susumu, Part Number=RL1220S-R82-F
R4: library part CMP-009-00064-2, "44.2K 0402 (1005 Metric)  SMD", Case/Package=0402, Power=63mW, Tolerance=1%, Mounting Technology=SMT, Pins=2
R5: library part CMP-009-00064-2, "6.04K 0402 (1005 Metric)  SMD", Case/Package=0402, Power=63mW, Tolerance=1%, Mounting Technology=SMT, Pins=2
R6 R7: library part CMP-2001-03173-1, Manufacturer=Susumu, Part Number=RL1220S-R82-F
R9: library part CMP-2002-08407-2, "RES Thick Film, 24.9kΩ, 1%, 0.063W, 100ppm/°C, 0402", Case Code (Imperial)=0402, Case Code (Metric)=1005, Max Operating Temperature=155°C, Max Power Dissipation=63mW, Min Operating Temperature=-55°C, Package Quantity=10, Resistance=24.9kR, Temperature Coefficient=100ppm/°C, Tolerance=1%, Voltage Rating=50V, Case/Package=0402, Composition="Thick Film", Contact Plating=Tin, Depth=0.5mm, Features="Automotive AEC-Q200", Height=0.35mm, Lead Free="Lead Free", Length=1mm, Military Standard=Not, Mount="Surface Mount", Number of Pins=2, Number of Terminations=2, Packaging="Tape and Reel", Power Rating=63mW, Radiation Hardening=No, Termination=SMD/SMT, Voltage Rating (DC)=50V, Weight=2.3E-05oz, Width=0.5mm
R10 R18 R20: library part CMP-2002-08123-3, "RES Thick Film, 100kΩ, 1%, 0.063W, 100ppm/°C, 0402", Case Code (Imperial)=0402, Case Code (Metric)=1005, Max Operating Temperature=155°C, Max Power Dissipation=63mW, Min Operating Temperature=-55°C, Package Quantity=10000, Resistance=100kR, Temperature Coefficient=100ppm/°C, Tolerance=1%, Voltage Rating=50V, Case/Package=0402, Composition="Thick Film", Contact Plating=Tin, Depth=0.5mm, Features="Automotive AEC-Q200", Height=0.35mm, Lead Free="Lead Free", Length=1mm, Military Standard=Not, Mount="Surface Mount", Number of Pins=2, Number of Terminations=2, Packaging="Tape and Reel", Power Rating=63mW, Radiation Hardening=No, Termination=SMD/SMT, Voltage Rating (DC)=50V, Weight=2.3E-05oz, Width=0.02inch
R11: library part CMP-009-00065-2, "100R 0.063W 1% 0402 (1005 Metric)  SMD", Case/Package=0402, Power=63mW, Tolerance=1%, Mounting Technology=SMT, Pins=2
R12: library part CMP-009-00066-2, "10K 0.063W 1% 0402 (1005 Metric)  SMD", Case/Package=0402, Power=63mW, Tolerance=1%, Mounting Technology=SMT, Pins=2
R13 R27: library part CMP-009-00009-5, "Chip Resistor, 1 KOhm, +/- 1%, 0.1 W, -55 to 155 degC, 0402 (1005 Metric)", Case/Package=0402, Max Operating Temperature=155°C, Min Operating Temperature=-55°C, Power=100mW, Tolerance=1%, Voltage Rating=50V, Mounting Technology=SM, Pins=2, RoHS Compliant=True
R14: library part CMP-009-00015-5, "Chip Resistor, 10 KOhm, +/- 1%, 0.1 W, -55 to 155 degC, 0402 (1005 Metric)", Case/Package=0402, Max Operating Temperature=155°C, Min Operating Temperature=-55°C, Power=100mW, Tolerance=1%, Voltage Rating=50V, Mounting Technology=SM, Pins=2, RoHS Compliant=True
R15 R16 R17: library part CMP-009-00096-2, "33R 0.063W 5% 0402 (1005 Metric)  SMD", Case/Package=0402, Power=63mW, Tolerance=5%, Mounting Technology=SMT, Pins=2
R19 R21 R23 R25 R26 R28: library part CMP-009-00084-2, "240R 0.063W 5% 0402 (1005 Metric)  SMD", Case/Package=0402, Power=63mW, Tolerance=5%, Mounting Technology=SMT, Pins=2
R22 R24 R29: library part CMP-009-00069-2, "120R 0.1W 5% 0603 (1608 Metric)  SMD", Case/Package=0603, Power=100mW, Tolerance=5%, Mounting Technology=SMT, Pins=2
RN1: "100 Ohm Â±5% 62.5mW Power Per Element Isolated 4 Resistor Network/Array Â±200ppm/Â°C 0804, Convex, Long Side Terminals", Package="SMD-8 Yageo", Check_prices=https://www.snapeda.com/parts/YC124-JR-07100RL/Yageo/view-part/?ref=eda, MF=Yageo, MP=YC124-JR-07100RL, SnapEDA_Link=https://www.snapeda.com/parts/YC124-JR-07100RL/Yageo/view-part/?ref=snap
RN2: library part YC124-JR-07100RL, "100K Ohm Â±5% 62.5mW Power Per Element Isolated 4 Resistor Network/Array Â±200ppm/Â°C 0804, Convex, Long Side Terminals", Package="SMD-8 Yageo", Check_prices=https://www.snapeda.com/parts/YC124-JR-07100RL/Yageo/view-part/?ref=eda, MF=Yageo, MP=YC124-JR-07100RL, SnapEDA_Link=https://www.snapeda.com/parts/YC124-JR-07100RL/Yageo/view-part/?ref=snap
U1: library part TPS26602PWPR, "4.2-V to 60-V, 150m&Omega;, 0.1-2.23A eFuse with integrated input reverse polarity protection 16-HTSSOP -40 to 125", Manufacturer_Name="Texas Instruments", Copyright="Copyright (C) 2025 Ultra Librarian. All rights reserved.", Manufacturer_Part_Number=TPS26602PWPR, RefDes=RefDes, Type=TYPE
U2 U3: "Bipolar Motor Driver Power MOSFET Step/Direction, UART 28-QFN (5x5)", Package=None, Check_prices=https://www.snapeda.com/parts/TMC2209-LA/Maxim+Integrated/view-part/?ref=eda, MF="Maxim Integrated Products", MP=TMC2209-LA, SnapEDA_Link=https://www.snapeda.com/parts/TMC2209-LA/Maxim+Integrated/view-part/?ref=snap
U5: "Automotive 2-ch, 1.65-V to 5.5-V inverters with Schmitt-Trigger inputs", Package="SOT-SC70-6 Texas Instruments", Check_prices=https://www.snapeda.com/parts/SN74LVC2G14IDCKRQ1/Texas+Instruments/view-part/?ref=eda, MF="Texas Instruments", MP=SN74LVC2G14IDCKRQ1, SnapEDA_Link=https://www.snapeda.com/parts/SN74LVC2G14IDCKRQ1/Texas+Instruments/view-part/?ref=snap
U6 U7: "Description", Manufacturer_Name=onsemi, Copyright="Copyright (C) 2025 Ultra Librarian. All rights reserved.", Manufacturer_Part_Number=RB520S30T5G, RefDes=RefDes, Type=Type

## Free pads (board coordinates)
  round 220 hole 120 mask+4.02: 20(193,196) 20(193,2696) 20(5693,196) 20(5693,2696)

## Via types
v1: diameter 24, hole 12, Top Copper to Bottom Copper, tented both sides, 452 vias
v2: diameter 39.37, hole 19.68, Top Copper to Bottom Copper, tented both sides, 106 vias
v3: diameter 40, hole 20, Top Copper to Bottom Copper, tented both sides, 11 vias
v4: diameter 60, hole 40, Top Copper to Bottom Copper, tented both sides, 2 vias
v5: diameter 60, hole 20, Top Copper to Bottom Copper, tented both sides, 1 vias